# Altium PCB BD3_yd_V1.0.PcbDoc
Units mm, origin at the board's own origin, x right, y up, seen from the top; angles counter-clockwise.
Board outline 136.1 x 133.6 mm, 4 copper layers (Top Layer, Signal Layer 1, Signal Layer 2, Bottom Layer), stack 0.778 mm thick; 64 components, 67 nets, 295 pads, 103 vias.
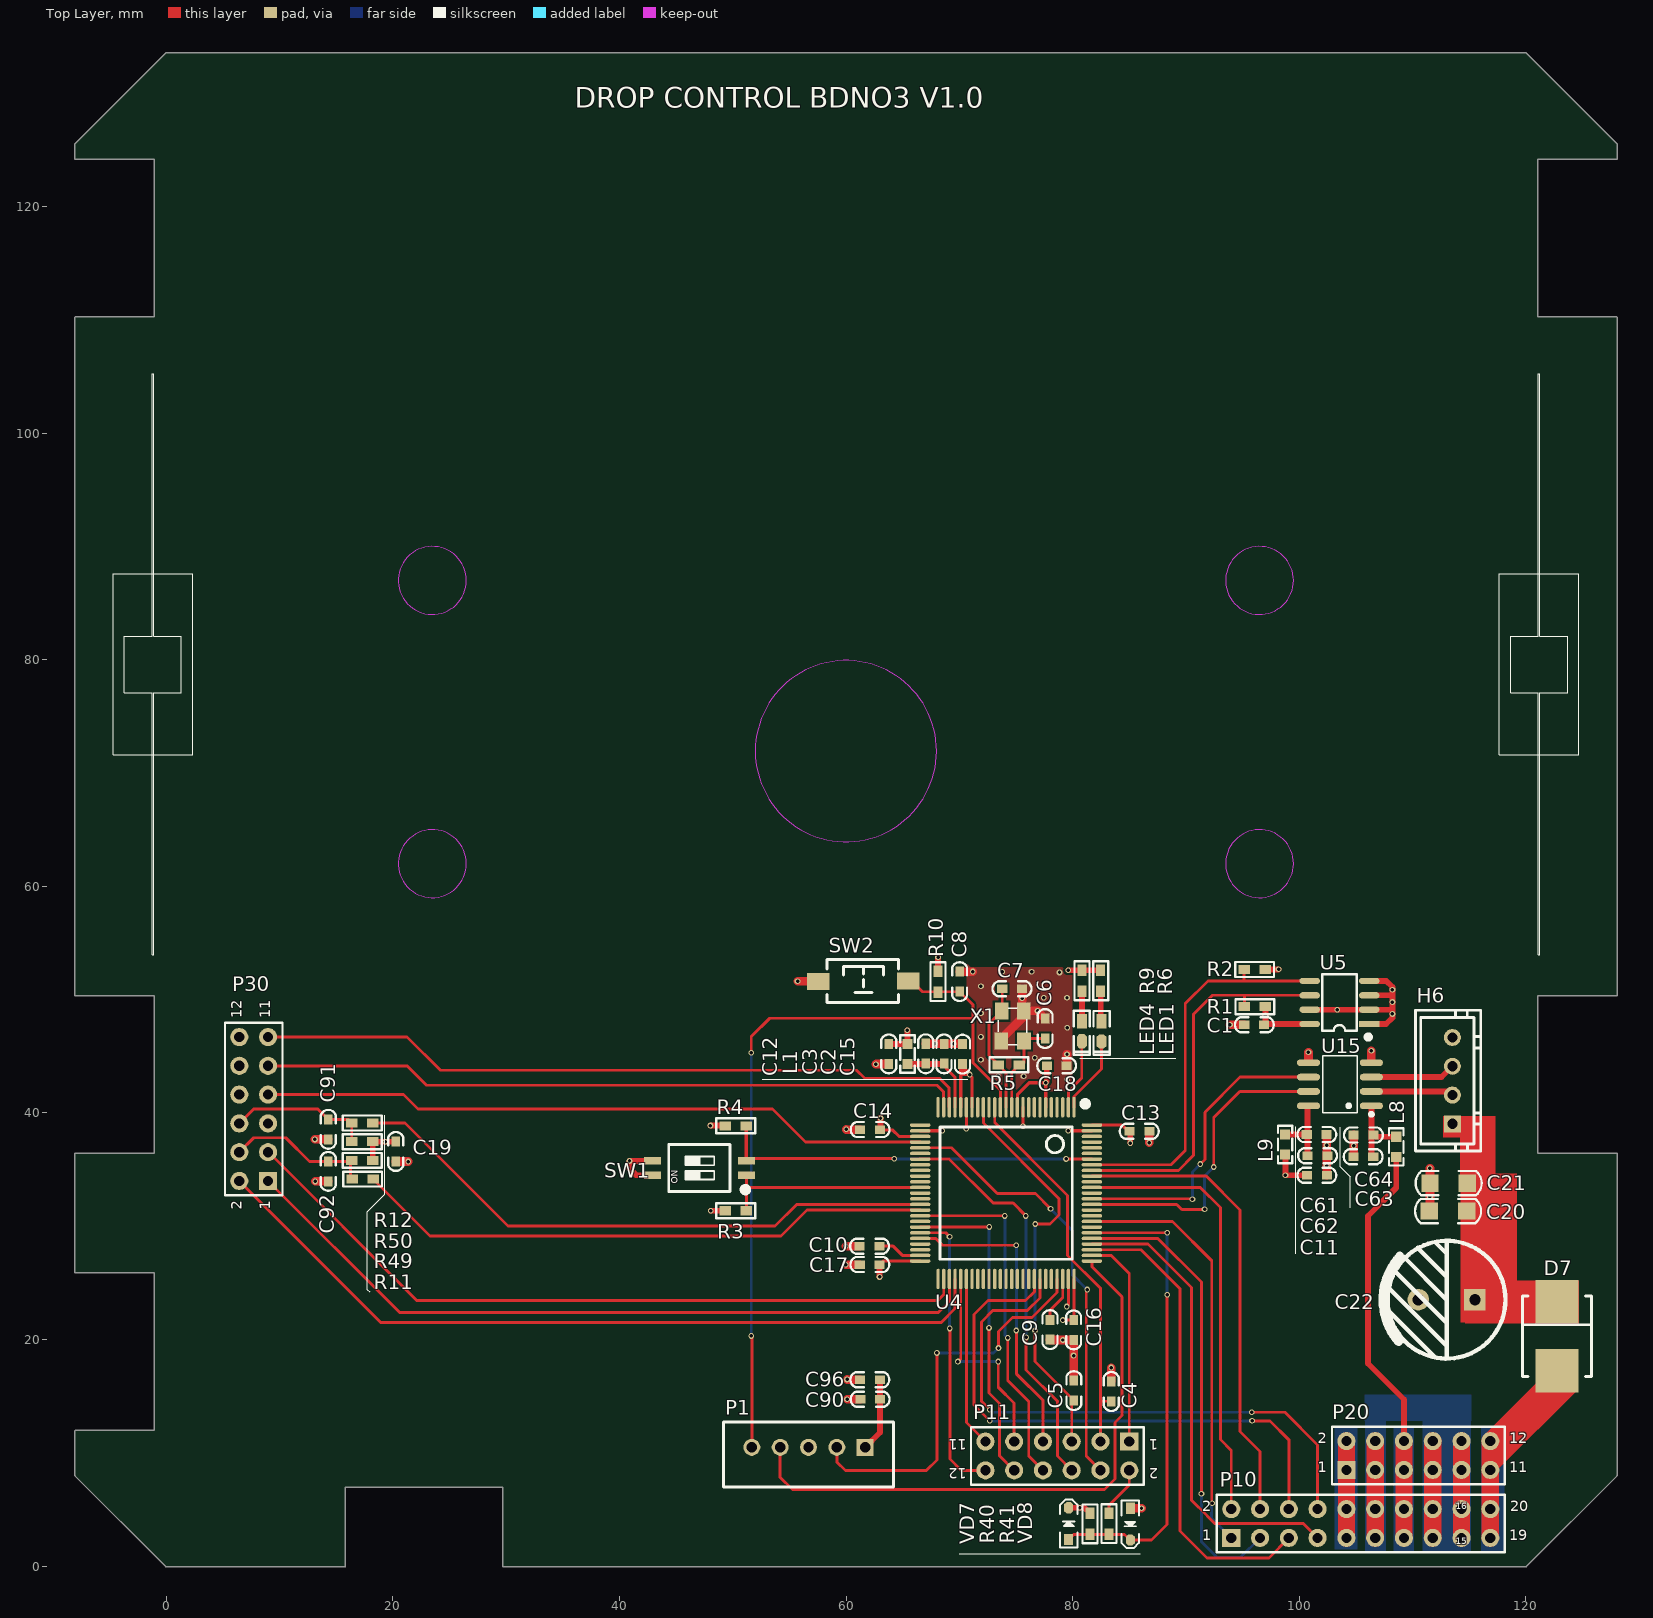
[diagram p0: Top Layer view]
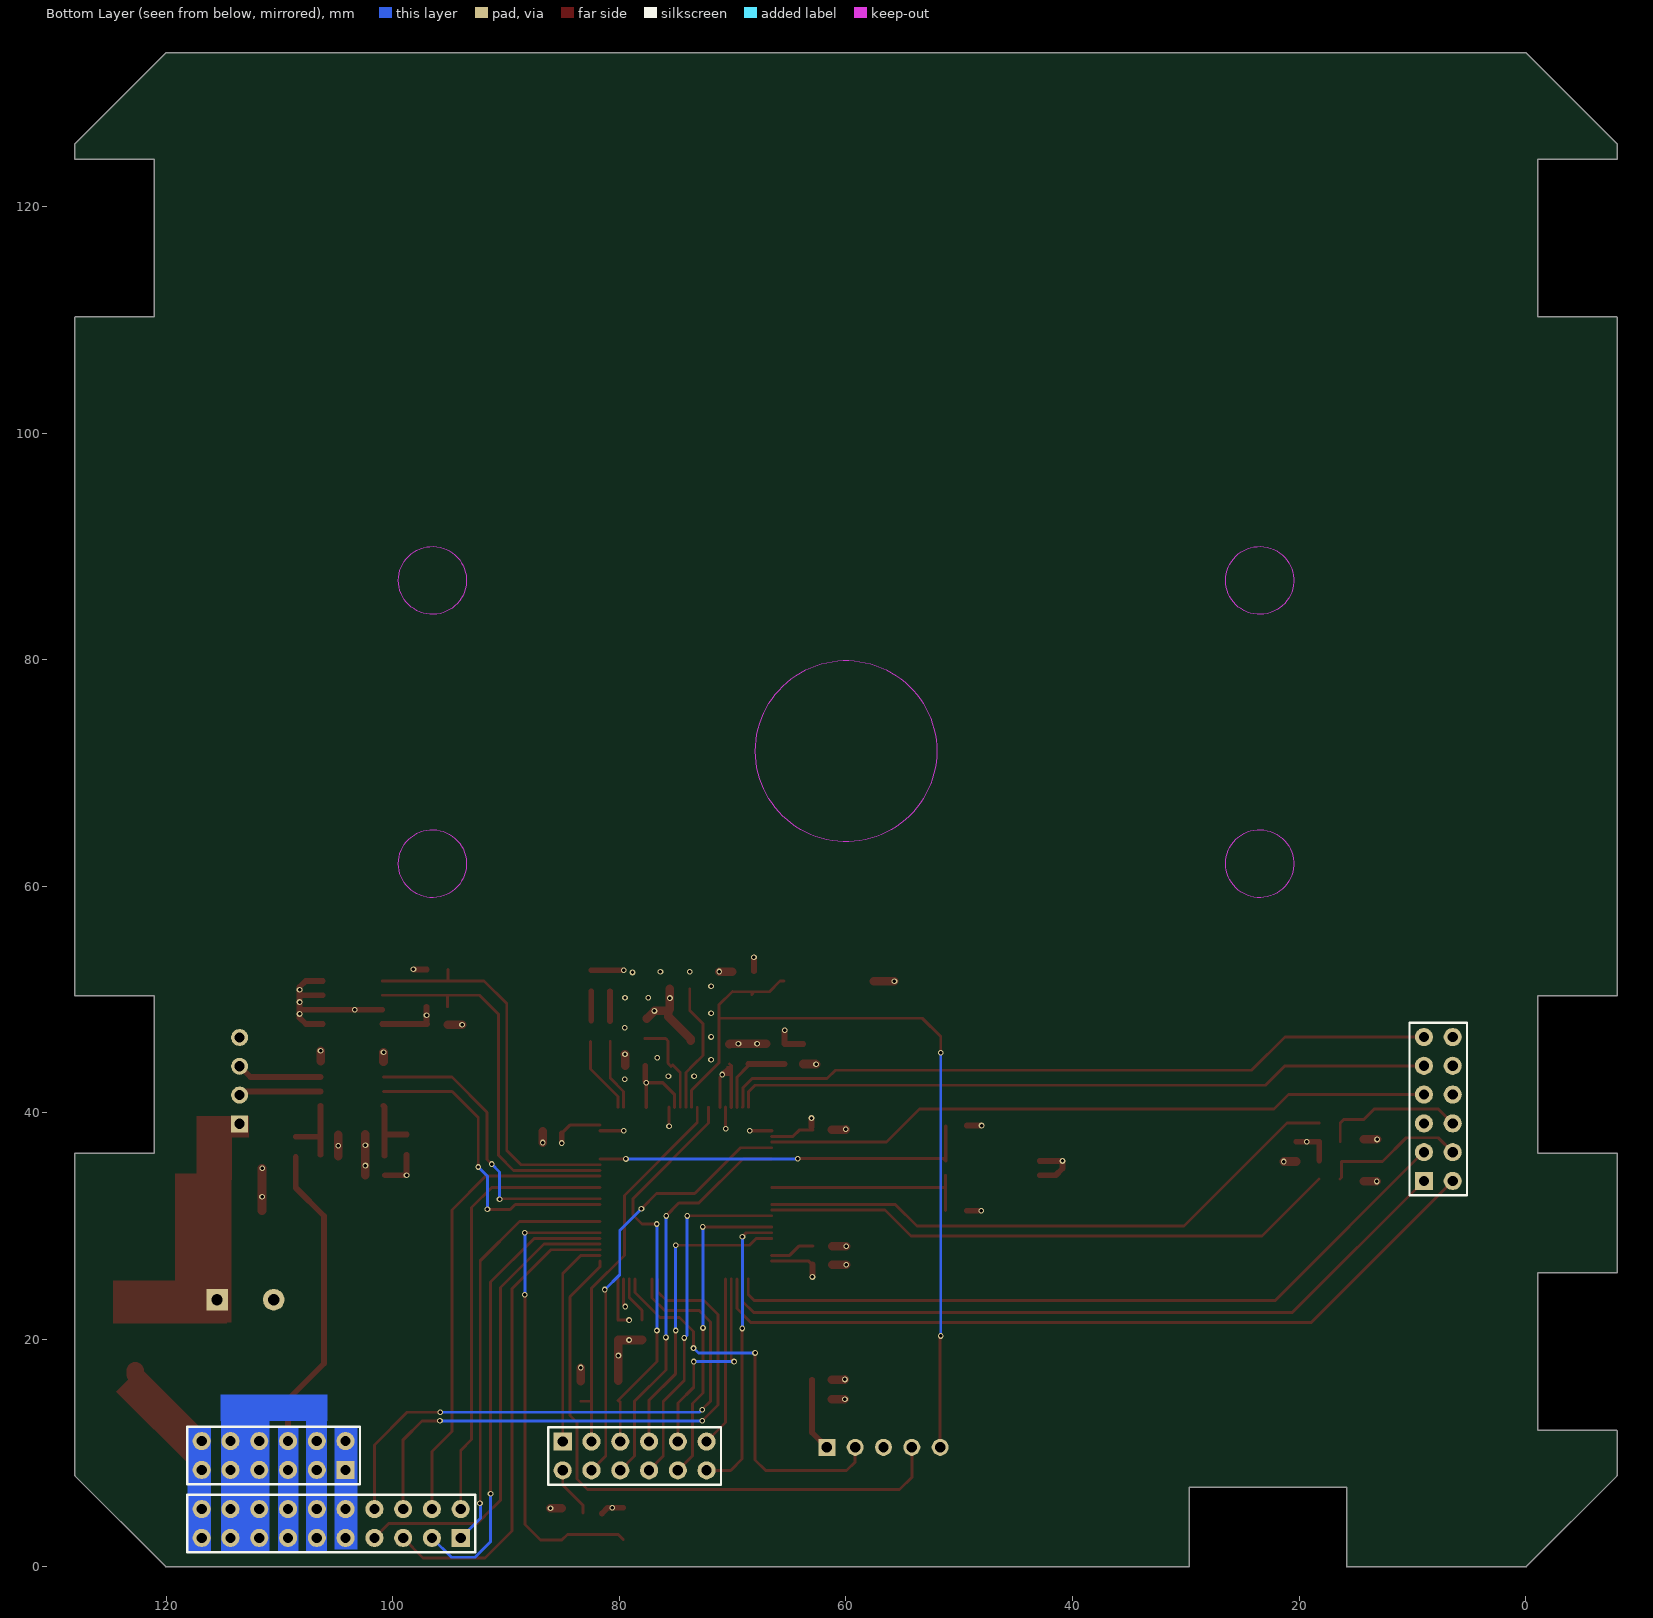
[diagram p1: Bottom Layer view, seen from below]
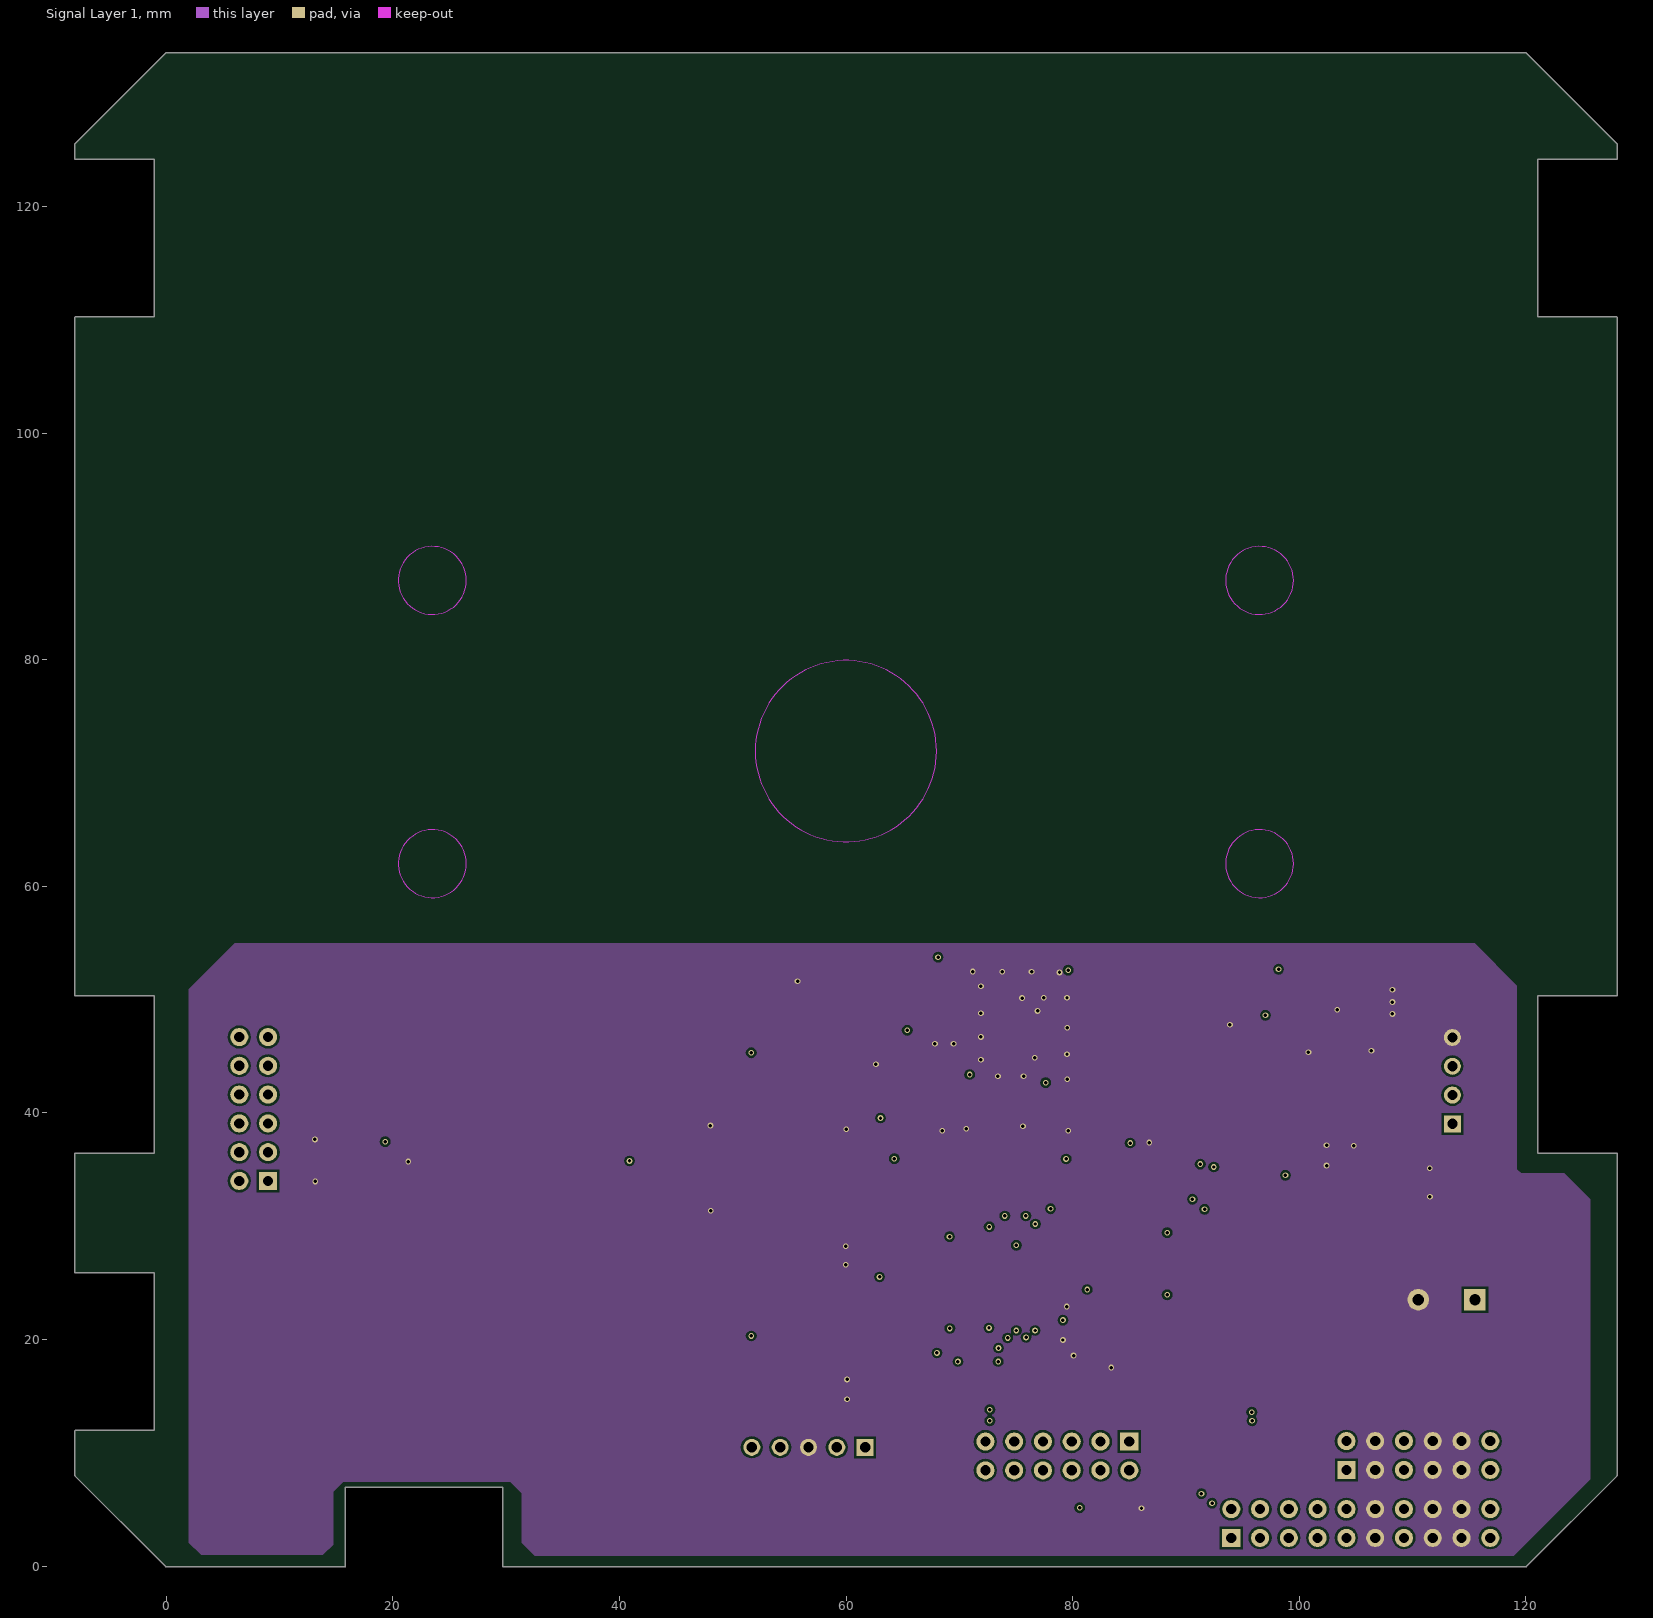
[diagram p2: Signal Layer 1]
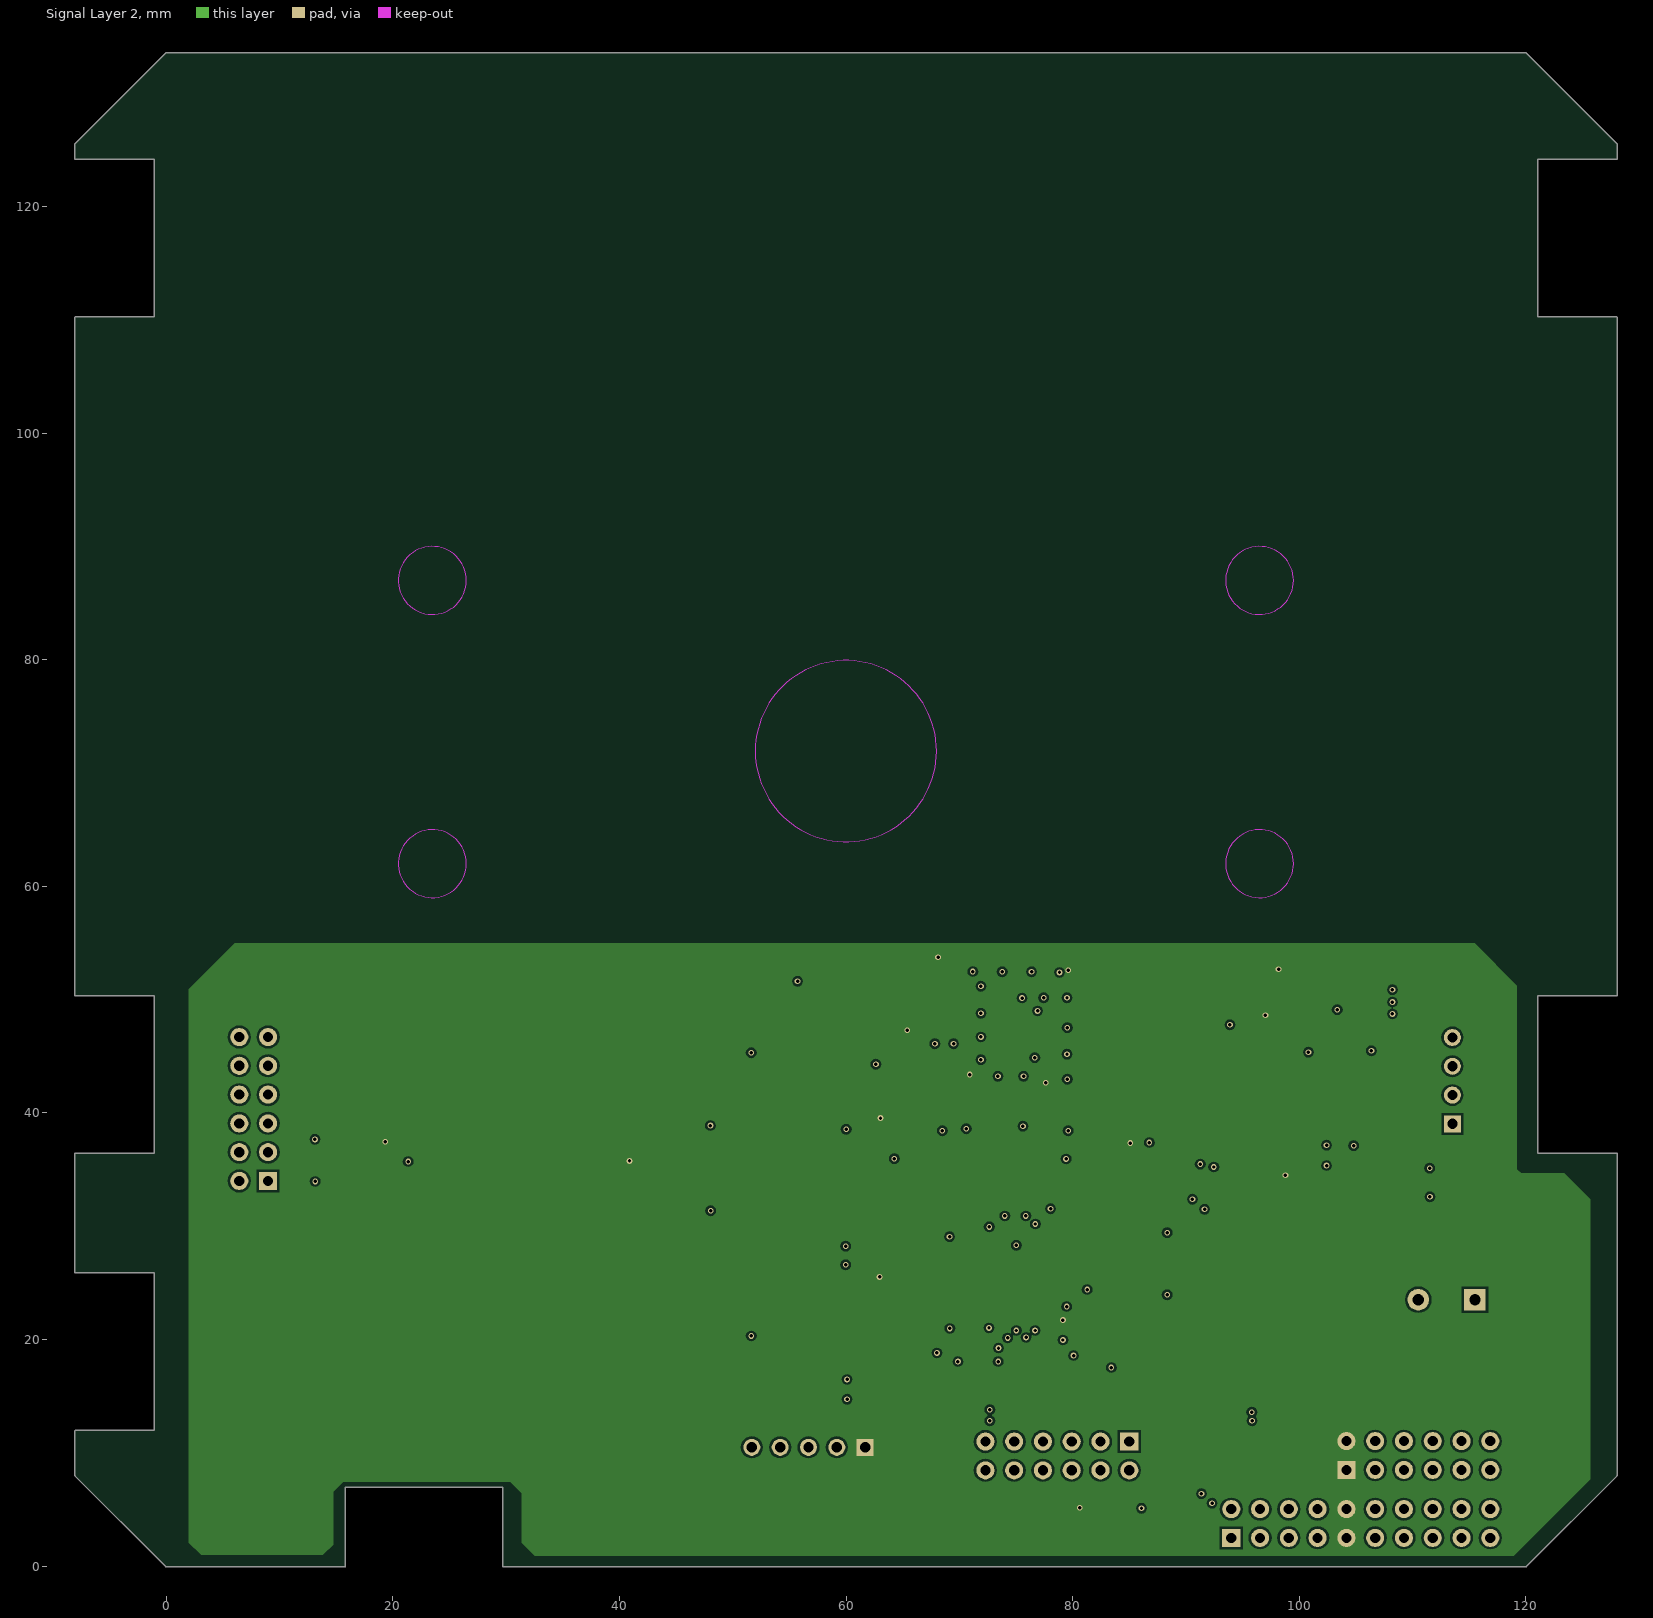
[diagram p3: Signal Layer 2]

## Layer stack, top to bottom
Top Layer: signal copper 0.0356
Dielectric: core 0.254, FR-4, Dk 4.2
Signal Layer 1: signal copper 0.036
Dielectric: prepreg 0.127, Dk 4.2
Signal Layer 2: signal copper 0.036
Dielectric: core 0.254, Dk 4.2
Bottom Layer: signal copper 0.0356

## Board outline
-8.05,8 -8.05,11.933 cw(c-8,11.933) -8,11.984 -1.05,11.984 -1.05,25.883 -8,25.883 cw(c-8,25.933) -8.05,25.933 -8.05,36.4 cw(c-8,36.4) -8,36.45 -1.05,36.45 -1.05,50.35 -8,50.35 cw(c-8,50.4) -8.05,50.4 -8.05,110.2 cw(c-8,110.2) -8,110.25 -1.05,110.25 -1.05,124.15 -8,124.15 cw(c-8,124.2) -8.05,124.2 -8.05,125.5 cw(c-8,125.5) -8.035,125.536 -8.036,125.536 -0.036,133.536 -0.036,133.535 cw(c0,133.5) 0,133.55 120,133.55 cw(c120,133.5) 120.036,133.535 128.035,125.536 cw(c128,125.5) 128.05,125.5 128.05,124.2 cw(c128,124.2) 128,124.15 121.05,124.15 121.05,110.25 128,110.25 cw(c128,110.2) 128.05,110.2 128.05,50.4 cw(c128,50.4) 128,50.35 121.05,50.35 121.05,36.45 128,36.45 cw(c128,36.4) 128.05,36.4 128.05,8 cw(c128,8) 128.035,7.964 128.036,7.964 120.036,-0.036 120.036,-0.035 cw(c120,0) 119.999,-0.05 29.773,-0.05 cw(c29.773,0) 29.723,0 29.723,6.95 15.824,6.95 15.824,0 cw(c15.773,0) 15.773,-0.05 0.001,-0.05 cw(c0,0) -0.036,-0.036 -8.035,7.964 cw(c-8,8)

## Design rules (kind name [scope] priority, off if disabled: settings)
Clearance Clearance_2 [InComponent('U4')] p1: gap=0.178
Clearance Clearance_4 [InComponent('U11')] p2: gap=0.178
Clearance Clearance_1 [InComponent('USB1')] p3: gap=0.152
Clearance Clearance_3 [InNetClass('HV Class')] p4: gap=0.7
Clearance [All] p5: gap=0.203
HoleSize [All] p1: absolutevalues=TRUE maxlimit=2539.975 minlimit=0.025 maxpercent=80.000 minpercent=20.000
MinimumSolderMaskSliver [All] p1: minsoldermaskwidth=0
PlaneConnect [InPadClass('All Pads')] p1: planeconnectstyle=Direct reliefexpansion=0.508 reliefentries=4 reliefconductorwidth=0.254 reliefairgap=0.254
PolygonConnect PolygonConnect_2 [IsVia] p1: connectstyle=Direct reliefconductorwidth=0.254 reliefentries=4 polygonreliefangle="90 Angle" airgapwidth=0.254
PolygonConnect PolygonConnect_1 [All vs InNet('GND')] p2: connectstyle=Direct reliefconductorwidth=0.254 reliefentries=4 polygonreliefangle="90 Angle" airgapwidth=0.254
PolygonConnect [All] p3: connectstyle=Direct reliefconductorwidth=0.254 reliefentries=4 polygonreliefangle="90 Angle" airgapwidth=0.254
RoutingVias RoutingVias_1 [All] p1: holewidth=0.305 width=0.508 viastyle="Through Hole" minholewidth=0.305 minwidth=0.508 maxholewidth=0.305 maxwidth=0.508
RoutingVias [All] p2: holewidth=0.305 width=2.54 viastyle="Through Hole" minholewidth=0.508 minwidth=2.54 maxholewidth=1.27 maxwidth=2.54
SilkToSilkClearance [All] p1: silktosilkclearance=0
SilkToSolderMaskClearance [IsPad] p1: minsilkscreentomaskgap=0 clearancetoexposedcopper=TRUE
SolderMaskExpansion [All] p1: expansion=0.102
Width [All] p1: maxlimit=5.08 minlimit=0.152 preferedwidth=0.254 minimp=50.000000 maximp=50.000000 favimp=50.000000
23 further rules are at their usual default settings.

## Classes and differential pairs
component class STM32F407: C1 C2 C3 C4 C5 C6 C7 C8 C9 C10 C11 C12 C13 C14 C15 C16 C17 C18 C19 C90 C91 C92 C96 L1 LED1 LED4 P1 P30 R1 R2 R3 R4 R5 R6 R9 R10 R11 R12 R49 R50 SW1 SW2 U4 U5 X1
component class Connect: C20 C21 C22 C61 C62 C63 C64 D7 H6 L8 L9 P10 P11 P20 R40 R41 U15 VD7 VD8

## Components (designator, comment, footprint, x,y, rotation, side; value= is the part's Value field where it differs from the comment)
C1 "0.1uF" "C 0603" 96.037,47.777 r0 top
C2 "0.1uF" "C 0603" 68.656,45.212 r270 top
C3 "1uF" "C 0603" 67.037,45.22 r270 top
C4 "0.1uF" "C 0603" 83.414,15.418 r270 top
C5 "0.1uF" "C 0603" 80.112,15.494 r270 top
C6 "20pF" "C 0603" 77.572,47.447 r270 top
C7 "20pF" "C 0603" 74.651,50.952 r180 top
C8 "1uF" "C 0603" 70.028,51.587 r270 top
C9 "0.1uF" "C 0603" 78.003,20.879 r90 top
C10 "0.1uF" "C 0603" 62.078,28.245 r0 top
C11 "0.1uF" "C 0603" 101.549,34.493 r180 top
C12 "0.1uF" "C 0603" 63.779,45.212 r90 top
C13 "0.1uF" "C 0603" 85.877,38.379 r180 top
C14 "0.1uF" "C 0603" 62.128,38.532 r0 top
C15 "0.1uF" "C 0603" 70.282,45.187 r270 top
C16 "0.1uF" "C 0603" 80.086,20.853 r90 top
C17 "0.1uF" "C 0603" 62.103,26.619 r0 top
C18 "0.1uF" "C 0603" 78.588,44.171 r180 top
C19 "0.1uF" "C 0603" 20.269,36.601 r90 top
C20 "0.1uF/50V" "C 1206" 113.132,31.344 r0 top
C21 "10uF/50V" "C 1206" 113.184,33.806 r0 top
C22 "220UF/50V" "CAP 5.0*10*12.5" 113.005,23.52 r180 top
C61 "0.1uF" "C 0603" 101.549,38.1 r0 top
C62 "1uF" "C 0603" 101.613,36.232 r0 top
C63 "1uF" "C 0603" 105.664,38.049 r180 top
C64 "0.1uF" "C 0603" 105.639,36.144 r180 top
C90 "1uF" "C 0603" 62.128,14.732 r180 top
C91 "0.1uF" "C 0603" 14.313,38.557 r90 top
C92 "0.1uF" "C 0603" 14.313,34.849 r90 top
C96 "0.1uF" "C 0603" 62.103,16.459 r180 top
D7 "MBRS330T3" MBRS340 122.733,17.247 r90 top
H6 "#NAME?" CONN-TH_4P-P2.50_ZX-XH2.54-4PZZ-Y 113.513,42.85 r270 top
L1 "120欧姆磁珠" "L 0603" 65.43,45.212 r270 top
L8 "120欧姆磁珠" "L 0603" 108.56,37.008 r90 top
L9 "120欧姆磁珠" "L 0603" 98.755,37.211 r270 top
LED1 "红色" "LED 0603R" 82.55,47.193 r270 top
LED4 "绿色" "LED 0603G" 80.803,47.206 r270 top
P1 "BX-XH2.54-5PZZ-Y" CONN-TH_BX-XH2.54-5PZZ-Y 56.691,10.491 r180 top
P10 "Header 10X2" HDR-10X2 94,2.5 r0 top locked
P11 "Header 6X2" HDR-6X2 85,11 r180 top locked
P20 "Header 6X2" HDR-6X2 104.16,8.5 r0 top locked
P30 "Header 6X2" HDR-6X2 9,34 r90 top locked
R1 "4.7K" "R 0603" 96.088,49.378 r180 top
R2 "4.7K" "R 0603" 96.063,52.654 r180 top
R3 "100K" "R 0603" 50.267,31.369 r180 top
R4 "100K" "R 0603" 50.267,38.862 r180 top
R5 "1M" "R 0603" 74.371,44.247 r180 top
R6 "1K" "R 0603" 82.474,51.664 r270 top
R9 "1K" "R 0603" 80.823,51.664 r270 top
R10 "10K" "R 0603" 68.123,51.587 r270 top
R11 "10R" "R 0603" 17.336,34.163 r0 top
R12 "10R" "R 0603" 17.31,39.116 r0 top
R40 "10K" "R 0603" 81.534,3.734 r270 top
R41 "0R" "R 0603" 83.21,3.759 r90 top
R49 "10K" "R 0603" 17.31,35.814 r180 top
R50 "10K" "R 0603" 17.31,37.465 r0 top
SW1 "CSW-2P" "CSW1.27 SMD-2P" 47.053,35.136 r90 top
SW2 "3x6x5" "TSW SMD-3*6*2.5" 61.544,51.638 r0 top
U4 "STM32F407VET6" "LQFP100 14x14_N" 74.124,32.926 r180 top
U5 "24C64" SOP8_N 103.548,49.749 r180 top
U15 "ADUM1201BRZ" SOIC-8_L4.9-W3.9-P1.27-LS6.0-BL 103.592,42.532 r90 top
VD7 "1N4148" SOD-323 79.654,3.759 r90 top
VD8 "1N4148" SOD-323 85.089,3.706 r270 top
X1 "8M" XTAL-3225 74.708,47.684 r0 top

## Footprints (in the part's own frame and the unit in brackets; to place one, negate y for a bottom-side part, rotate by r counter-clockwise, add the part's x,y. Pads: shape width x height; smd on the part's side, far side on the other; paste and mask are expansions set on the pad)
"C 0603" [mil]
  rect 35x30 smd: 1(-35,0) 2(34,0)
  silkscreen extent -67,-26 67,26, body extent -31,-16 31,16, height 32
"C 1206" [mil]
  rect 60x60 smd: 1(-65,0) 2(65,0)
  silkscreen extent -115,-42 115,42, body extent -63,-32 63,32, height 48
"CAP 5.0*10*12.5" [mm]
  rect 1.9x1.9 hole 1: 1(-2.5,0)
  round 1.9 hole 1: 2(2.5,0)
  silkscreen extent -5.2,-5.21 5.64,5.2, body extent -5,-5.01 5.01,4.99, height 12.55
CONN-TH_4P-P2.50_ZX-XH2.54-4PZZ-Y [mm]
  rect 1.5x1.5 hole 0.9: 1(3.81,0)
  round 1.5 hole 0.9: 2(1.27,0) 3(-1.27,0) 4(-3.81,0)
  silkscreen extent -6.21,-3.25 6.21,2.5
CONN-TH_BX-XH2.54-5PZZ-Y [mm]
  rect 1.5x1.5 hole 0.9 copper offset 0,0 paste+0 mask+0.05: 1(-5,0)
  round 1.5 hole 0.9 paste+0 mask+0.05: 2(-2.5,0) 4(2.5,0)
  round 1.5 hole 0.9 copper offset 0,0 paste+0 mask+0.05: 3(0,0) 5(5,0)
  silkscreen extent -7.5,-2.25 7.5,3.5
"CSW1.27 SMD-2P" [mm]
  rect 0.65x1.5 smd: 1(-0.635,-4.15) 2(0.635,-4.15) 3(0.635,4.15) 4(-0.635,4.15)
  silkscreen extent -2.15,-4.31 2.07,2.7, body extent -2.07,-4.35 2.07,4.35, height 2.35
HDR-6X2 [mm]
  rect 1.6x1.6 hole 0.9: 1(0,0)
  round 1.6 hole 0.9: 2(0,2.54) 3(2.54,0) 4(2.54,2.54) 5(5.08,0) 6(5.08,2.54) 7(7.62,0) 8(7.62,2.54) 9(10.16,0) 10(10.16,2.54) 11(12.7,0) 12(12.7,2.54)
  silkscreen extent -1.27,-1.27 13.97,3.81, body extent -1.27,-1.27 13.97,3.81, height 8.5
HDR-10X2 [mm]
  rect 1.6x1.6 hole 0.9: 1(0,0)
  round 1.6 hole 0.9: 2(0,2.54) 3(2.54,0) 4(2.54,2.54) 5(5.08,0) 6(5.08,2.54) 7(7.62,0) 8(7.62,2.54) 9(10.16,0) 10(10.16,2.54) 11(12.7,0) 12(12.7,2.54) 13(15.24,0) 14(15.24,2.54) 15(17.78,0) 16(17.78,2.54) 17(20.32,0) 18(20.32,2.54) 19(22.86,0) 20(22.86,2.54)
  silkscreen extent -1.27,-1.27 24.13,3.81, body extent -1.27,-1.27 24.13,3.81, height 8.5
"L 0603" [mil] "С?"
  rect 35x35 smd: 1(-35,0) 2(35,0)
  silkscreen extent -65,-25 65,25, body extent -31,-16 31,16, height 31
"LED 0603G" [mil]
  rect 50x35 smd: 1(-35,0.26)
  oct 50x35 smd: 2(35,0.26)
  silkscreen extent -71,-28 81,28, body extent -31,-16 32,16, height 24
"LED 0603R" [mil]
  rect 50x35 smd: 1(-35,0.26)
  oct 50x35 smd: 2(35,0.26)
  silkscreen extent -71,-28 81,28, body extent -24,-16 24,16, height 24
"LQFP100 14x14_N" [mm] "100脚?"
  oval 0.3x1.8 smd: 1(-6,-7.575) 2(-5.5,-7.575) 3(-5,-7.575) 4(-4.5,-7.575) 5(-4,-7.575) 6(-3.5,-7.575) 7(-3,-7.575) 8(-2.5,-7.575) 9(-2,-7.575) 10(-1.5,-7.575) 11(-1,-7.575) 12(-0.5,-7.575) 13(0,-7.575) 14(0.5,-7.575) 15(1,-7.575) 16(1.5,-7.575) 17(2,-7.575) 18(2.5,-7.575) 19(3,-7.575) 20(3.5,-7.575) 21(4,-7.575) 22(4.5,-7.575) 23(5,-7.575) 24(5.5,-7.575) 25(6,-7.575) 51(6,7.575) 52(5.5,7.575) 53(5,7.575) 54(4.5,7.575) 55(4,7.575) 56(3.5,7.575) 57(3,7.575) 58(2.5,7.575) 59(2,7.575) 60(1.5,7.575) 61(1,7.575) 62(0.5,7.575) 63(0,7.575) 64(-0.5,7.575) 65(-1,7.575) 66(-1.5,7.575) 67(-2,7.575) 68(-2.5,7.575) 69(-3,7.575) 70(-3.5,7.575) 71(-4,7.575) 72(-4.5,7.575) 73(-5,7.575) 74(-5.5,7.575) 75(-6,7.575)
  oval 1.8x0.3 smd: 26(7.576,-6) 27(7.576,-5.5) 28(7.576,-5) 29(7.576,-4.5) 30(7.576,-4) 31(7.576,-3.5) 32(7.576,-3) 33(7.576,-2.5) 34(7.576,-2) 35(7.576,-1.5) 36(7.576,-1) 37(7.576,-0.5) 38(7.576,0) 39(7.576,0.5) 40(7.576,1) 41(7.576,1.5) 42(7.576,2) 43(7.576,2.5) 44(7.576,3) 45(7.576,3.5) 46(7.576,4) 47(7.576,4.5) 48(7.576,5) 49(7.576,5.5) 50(7.576,6) 76(-7.575,6) 77(-7.575,5.5) 78(-7.575,5) 79(-7.575,4.5) 80(-7.575,4) 81(-7.575,3.5) 82(-7.575,3) 83(-7.575,2.5) 84(-7.575,2) 85(-7.575,1.5) 86(-7.575,1) 87(-7.575,0.5) 88(-7.575,0) 89(-7.575,-0.5) 90(-7.575,-1) 91(-7.575,-1.5) 92(-7.575,-2) 93(-7.575,-2.5) 94(-7.575,-3) 95(-7.575,-3.5) 96(-7.575,-4) 97(-7.575,-4.5) 98(-7.575,-5) 99(-7.575,-5.5) 100(-7.575,-6)
  silkscreen extent -7.23,-8.12 5.84,5.84, body extent -8,-8 8,8, height 1.45
MBRS340 [mil]
  rect 150x150 smd: 1(0,0) 2(240,0)
  silkscreen extent -20,-120 260,120
"R 0603" [mil]
  rect 40x31.5 smd: 1(-36.5,0) 2(36.5,0)
  silkscreen extent -68,-26 68,26, body extent -31,-16 32,16, height 16
SOD-323 [mm]
  rect 1x0.8 smd: 1(-1.4,0)
  oct 1x0.8 smd: 2(1.4,0)
  silkscreen extent -2.11,-0.76 2.11,0.76, body extent -1.34,-0.63 1.31,0.67, height 1
SOIC-8_L4.9-W3.9-P1.27-LS6.0-BL [mm]
  oval 0.588x2.045 smd: 1(-1.905,-2.772) 2(-0.635,-2.772) 3(0.635,-2.772) 4(1.905,-2.772) 5(1.905,2.772) 6(0.635,2.772) 7(-0.635,2.772) 8(-1.905,2.772)
  silkscreen extent -2.8,-2.92 2.53,1.52
SOP8_N [mm] "5*6*1"
  rect 1.8x0.55 smd: 1(-2.625,1.905)
  oval 1.8x0.55 smd: 2(-2.625,0.635) 3(-2.625,-0.635) 4(-2.625,-1.905) 5(2.625,-1.905) 6(2.625,-0.635) 7(2.625,0.635) 8(2.625,1.905)
  silkscreen extent -2.69,-2.5 1.52,3.2, body extent -3,-2.5 3,2.5, height 1.9
"TSW SMD-3*6*2.5" [mm]
  rect 2x1.5 smd: 1(-3.996,-0.02) 2(3.937,0)
  silkscreen extent -3.21,-1.9 3.09,1.9, body extent -4,-1.88 4,1.62, height 2.59
XTAL-3225 [mm]
  rect 1.2x1.5 smd: 1(-0.978,1.295) 2(-1.003,-1.321) 3(1.003,-1.321) 4(0.978,1.321)
  silkscreen extent -1.28,-1.65 1.22,1.55, body extent -1.27,-1.65 1.23,1.55, height 0.8

## Part data
D7: library part "DIODE SCHOTTKY", "Schottky Diode"
H6: library part HB-PH3-25414PB2GOP
L1 L8 L9: library part FERRITBEAD
LED1 LED4: library part LED-SMD, "贴?"
P10: "Header, 10-Pin, Dual row"
P11 P20 P30: "Header, 6-Pin, Dual row"
U5: library part 24LC02

## Via types
v1: diameter 0.508, hole 0.305, Top Layer to Bottom Layer, 103 vias

## Nets (pads, with @x,y where several pads share a name; then routed paths per layer and width w, separated by ;. In a path a pad name is that pad's centre, name@x,y a point inside that pad or via, vN(x,y) a via of type N, cw(c..) or ccw(c..) an arc to the next point about the centre after c; other vN are vias at no path point)
A2: C4.2 P11.3 U4.15 | length 34.3
  Top Layer w0.254: U4.15 73.123,39.145 79.553,32.715 79.553,27.432 82.46,24.525 82.46,14.554 ; P11.3 82.46,14.554 ; C4.2 82.46,14.554
ADC2: C5.2 P11.5 U4.17 | length 35.4
  Top Layer w0.254: U4.17 72.123,39.103 78.791,32.436 78.791,30.988 78.003,30.201 v1(76.708,30.201) ; v1(76.683,20.803) 76.683,18.059 C5.2 ; P11.5 79.92,14.464 C5.2@80.086,14.63
  Bottom Layer w0.254: v1(76.683,20.803) 76.683,30.175 v1(76.708,30.201)
ADC3: U4.18
B2: U4.16
BOOT0: R4.1 SW1.2 U4.94 | length 33.7
  Top Layer w0.279: SW1.2@51.194,35.78 R4.1 ; SW1.2 51.398,35.966 v1(64.262,35.966) ; v1(79.426,35.941) 79.44,35.926 U4.94
  Bottom Layer w0.279: v1(64.262,35.966) 64.262,35.941 v1(79.426,35.941)
BOOT1: R3.1 SW1.1 U4.37 | length 19.5
  Top Layer w0.254: R3.1@51.203,31.378 SW1.1 51.203,33.481 51.257,33.426 U4.37
DRDY: U4.3
GND: C1.1 C2.1 C3.1 C4.1 C5.1 C6.1 C7.1 C8.1 C9.1 C10.1 C11.1 C12.1 C13.1 C14.1 C15.1 C16.1 C17.1 C18.1 C19.1 C20.1 C21.1 C22.2 C61.2 C62.2 C63.2 C64.2 C90.2 C91.1 C92.1 C96.2 H6.4 P1.3 P10.11 P10.12 P10.15 P10.16 P10.17 P10.18 P20.3 P20.4 P20.7 P20.8 P20.9 P20.10 R3.2 R4.2 SW2.1 U4.10 U4.20 U4.27 U4.74 U4.99 U5.1 U5.2 U5.3 U5.4 U5.7 U15.4 U15.5 VD8.1 X1.2 X1.4 | length 101.6
  Top Layer w0.279: U4.27 68.5,38.426 v1(68.504,38.43) ; v1(70.612,38.608) 70.623,38.619 U4.20 ; v1(75.616,38.837) 75.616,38.786 75.623,38.778 U4.10 ; v1(79.477,22.911) 79.623,23.058 U4.74 ; v1@79.604,38.426 U4.99
  Top Layer w0.508: v1(48.031,38.887) 49.314,38.887 R4.2 ; v1(48.057,31.369) R3.2 ; U5.7 v1(103.353,49.114) U5.2 108.153,49.114 ; U5.1 107.661,47.844 108.219,48.402 v1(108.219,48.743) v1(108.219,49.784) v1(108.219,50.876) 108.219,51.115 107.681,51.654 U5.4 ; U5.3 108.153,50.384
  Top Layer w0.762: v1(13.132,37.668) C91.1 ; v1(13.157,33.96) C92.1 ; C19.1 v1(21.361,35.712) ; v1(55.728,51.613) 55.733,51.618 SW2.1 ; v1(59.969,26.594) 59.995,26.619 C17.1 ; v1(59.969,28.245) C10.1 ; v1(60.02,38.557) 60.046,38.532 C14.1 ; v1(60.096,14.732) C90.2 ; v1(60.096,16.485) 60.122,16.459 C96.2 ; v1(62.636,44.298) 62.662,44.323 C12.1 ; C3.1 v1(67.843,46.109) v1(69.494,46.109) 70.248,46.109 C15.1 ; C8.1 v1(71.196,52.476) ; X1.2 73.704,46.533 75.686,48.514 X1.4 ; C7.1 v1(75.54,50.14) 75.54,49.151 X1.4 ; C6.1 v1(76.903,49.005) X1.4 ; C9.1 78.029,19.964 v1(79.146,19.964) C16.1 v1(80.086,18.593) 80.086,16.408 C5.1 ; C18.1 79.477,45.161 v1(79.502,45.187) ; C4.1 v1(83.414,17.526) ; VD8.1 v1(86.08,5.106) ; v1(86.766,37.389) C13.1 ; v1(93.878,47.777) C1.1 ; v1(100.813,45.364) 100.819,45.358 U15.5@100.819,44.526 ; C61.2 v1(102.413,37.16) v1(102.413,35.357) 102.413,34.519 C11.1 ; C64.2@104.8,36.17 v1(104.8,37.109) C63.2 ; U15.4@106.364,44.552 v1(106.364,45.481) ; v1(111.506,35.128) 111.533,35.101 C21.1 v1(111.533,32.602) C20.1@111.533,31.397
  Top Layer w1.524: P10.11 P10.12 P20.3 P20.4 ; P10.15 P10.16 P20.7 P20.8 ; P10.17 P10.18 P20.9 P20.10
  other v1: 79.604,38.43 79.527,42.977 73.406,43.231 75.667,43.231 71.907,44.704 76.657,44.882 71.907,46.711 79.527,47.523 71.907,48.793 77.445,50.165 79.502,50.165 71.907,51.181 78.842,52.4 73.787,52.451 76.378,52.451
IIC_SCL: R1.2 U4.92 U5.6 | length 33.9
  Top Layer w0.254: U4.92 89.333,34.926 90.678,36.271 90.678,48.717 92.344,50.384 U5.6 ; R1.2 95.161,50.32
IIC_SCL_0: U4.70
IIC_SDA: R2.2 U4.93 U5.5 | length 34.5
  Top Layer w0.254: U4.93 88.69,35.426 89.941,36.678 89.941,49.657 91.938,51.654 U5.5 ; 95.136,51.666 R2.2
IIC_SDA_0: U4.71
LEDG: LED4.2 U4.2 | length 6.3
  Top Layer w0.254: U4.2 79.623,41.904 80.809,43.09 LED4.2
LEDR: LED1.2 U4.1 | length 6.8
  Top Layer w0.254: U4.1 80.123,41.439 82.557,43.872 LED1.2
MCU＿NRST: C8.2 P1.5 R10.2 SW2.2 U4.14 | length 73.4
  Top Layer w0.254: v1(51.638,20.32) 51.691,20.267 P1.5 ; v1(51.638,45.314) 51.638,46.736 53.264,48.362 71.196,48.362 ; SW2.2 65.811,51.638 66.751,50.698 70.002,50.698 C8.2 71.196,49.555 71.196,48.362 ; R10.2 R10.2@68.313,50.47 ; U4.14 73.623,41.997 71.196,44.425 71.196,48.362
  Bottom Layer w0.254: v1(51.638,20.32) v1(51.638,45.314)
NetC6_2: C6.2 R5.1 U4.12 X1.3 | length 8.5
  Top Layer w0.254: U4.12 74.623,43.572 R5.1 ; R5.1@75.432,44.113 75.711,44.393 X1.3 75.914,46.566 C6.2@77.756,46.566
NetC7_2: C7.2 R5.2 U4.13 X1.1 | length 11.5
  Top Layer w0.254: X1.1 72.619,47.868 72.619,45.072 R5.2 74.123,43.567 U4.13 ; X1.1@73.787,49.036 C7.2
NetC9_2: C9.2 U4.73 | length 4.1
  Top Layer w0.254: C9.2 78.003,22.581 79.123,23.701 U4.73
NetC10_2: C10.2 U4.49 | length 3.9
  Top Layer w0.279: C10.2 64.16,28.245 64.979,27.426 U4.49
NetC20_2: C20.2 C21.2 C22.1 D7.2 H6.1
NetC61_1: C61.1 C62.1 L9.1 U15.8 | length 6.3
  Top Layer w0.508: L9.1 C61.1 ; C62.1 100.724,40.531 U15.8
NetC63_1: C63.1 C64.1 L8.2 U15.1 | length 6.2
  Top Layer w0.508: C64.1@106.364,36.307 C63.1@106.364,37.897 ; C63.1@106.364,38.049 U15.1 ; C63.1@106.517,37.897 L8.2
NetC91_2: C91.2 P30.6 R12.1 R50.1 | length 12.6
  Top Layer w0.254: P30.6 7.73,40.35 13.384,40.35 C91.2 16.078,39.421 R12.1 R50.1
NetC92_2: C92.2 P30.4 R11.1 R49.2 | length 12.8
  Top Layer w0.254: P30.4 7.73,37.81 10.552,37.81 12.649,35.712 C92.2 16.282,35.712 16.282,34.29 R11.1
NetD7_1: D7.1 P10.19 P10.20 P20.11 P20.12 | length 17.2
  Top Layer w1.524: P10.19 P10.20 P20.11 P20.12 122.733,16.913 D7.1
NetLED1_1: LED1.1 R6.2 | length 2.6
  Top Layer w0.508: LED1.1@82.474,48.165 R6.2
NetLED4_1: LED4.1 R9.2 | length 2.6
  Top Layer w0.508: LED4.1@80.823,48.108 R9.2
NetP10_1: P10.1 U4.83 | length 37.2
  Top Layer w0.254: U4.83 88.801,30.426 92.278,26.949 92.278,5.588 v1(92.304,5.563)
  Bottom Layer w0.254: v1@92.278,5.588 92.266,5.576 92.266,4.234 P10.1
NetP10_3: P10.3 U4.80 | length 40.6
  Top Layer w0.254: U4.80 87.507,28.926 91.364,25.07 v1(91.364,6.401)
  Bottom Layer w0.254: v1(91.364,6.401) 91.364,2.159 92.735,0.787 94.827,0.787 P10.3
NetP11_2: P11.2 R41.2 | length 4.5
  Top Layer w0.254: R41.2 83.21,5.385 85,7.174 P11.2
NetP11_7: P11.7 U4.46 | length 27
  Top Layer w0.254: U4.46 67.924,28.926 68.529,28.321 v1(75.032,28.321) ; v1(75.032,20.803) 75.032,16.993 77.38,14.644 P11.7
  Bottom Layer w0.254: v1(75.032,20.803) v1(75.032,28.321)
NetP11_8: P11.8 U4.42 | length 31.3
  Top Layer w0.254: U4.42 74.016,30.926 v1(74.016,30.912) ; v1(74.27,20.142) 74.27,16.383 76.124,14.529 76.124,9.716 P11.8
  Bottom Layer w0.254: v1(74.016,30.912) 74.016,20.396 v1(74.27,20.142)
NetP11_10: P11.10 U4.44 | length 28.5
  Top Layer w0.254: U4.44 72.619,29.926 72.639,29.947 v1(72.644,29.947) ; v1(72.619,21.031) 72.619,15.291 73.558,14.351 73.558,9.742 P11.10
  Bottom Layer w0.254: v1(72.619,21.031) 72.619,29.921 v1(72.644,29.947)
NetP11_12: P11.12 U4.45 | length 25.9
  Top Layer w0.254: U4.45 68.795,29.426 v1(69.139,29.083) ; v1(69.164,20.98) 69.164,9.474 70.178,8.46 P11.12
  Bottom Layer w0.254: v1(69.139,29.083) 69.139,21.006 v1(69.164,20.98)
NetR40_2: R40.2 R41.1 U4.81 VD7.1 VD8.2 | length 42.1
  Top Layer w0.254: VD7.1 80.102,2.807 R40.2 84.589,2.807 VD8.2 86.965,2.306 88.341,3.683 v1(88.341,23.952) ; U4.81 88.329,29.426 v1(88.341,29.439)
  Bottom Layer w0.254: v1(88.341,23.952) v1(88.341,29.439)
OLED_CS: P30.7 U4.29 | length 59.3
  Top Layer w0.254: P30.7 20.94,41.62 22.225,40.335 53.518,40.335 56.427,37.426 U4.29
OLED_DC: P30.9 U4.24 | length 61.9
  Top Layer w0.254: P30.9 21.27,44.16 22.987,42.443 68.021,42.443 68.621,41.844 U4.24@68.621,40.502
OLED_RES: P30.11 U4.23 | length 63.7
  Top Layer w0.254: P30.11 21.27,46.7 24.206,43.764 60.935,43.764 61.671,43.028 68.275,43.028 69.078,42.225 69.078,40.547 U4.23
PA15/JTDI: P11.1 U4.77 | length 18.8
  Top Layer w0.254: U4.77 83.408,27.426 85,25.834 P11.1
PF_EN: U4.5
PRO: U4.57
RXD1_PC: P10.8 U4.69 | length 51.6
  Top Layer w0.254: v1(72.695,13.818) 71.958,14.554 71.958,21.565 72.974,22.581 76.022,22.581 77.123,23.682 U4.69 ; v1(95.809,13.589) 98.73,13.589 101.62,10.699 P10.8
  Bottom Layer w0.254: v1(72.695,13.818) 72.923,13.589 v1(95.809,13.589)
RXD2_5V: H6.3 U15.3 | length 7.5
  Top Layer w0.508: U15.3 112.56,43.167 H6.3
RXD2_RS485: U4.87 U15.6 | length 27.5
  Top Layer w0.254: U4.87 90.535,32.426 v1(90.576,32.385) ; v1(91.262,35.484) 91.669,35.89 91.669,40.056 94.78,43.167 U15.6
  Bottom Layer w0.254: v1(90.576,32.385) 90.576,34.798 v1(91.262,35.484)
RXD3_RS232: P11.11 U4.56 | length 15
  Top Layer w0.254: U4.56 70.623,12.677 P11.11
RXD4_HV: P10.7 U4.79 | length 41.7
  Top Layer w0.254: U4.79 86.661,28.426 90.5,24.587 90.5,5.817 91.846,4.47 91.846,4.459 92.535,3.77 100.35,3.77 P10.7
SPI_MISO_1: U4.31
SPI_MISO_2: P30.1 U4.53 | length 67.3
  Top Layer w0.254: P30.1 20.623,22.377 68.148,22.377 69.123,23.353 U4.53
SPI_MISO_3: U4.90
SPI_MOSI_1: P11.6 U4.32 | length 35.5
  Top Layer w0.254: U4.32 69.103,35.926 72.987,32.042 74.752,32.042 75.87,30.925 v1(75.87,30.912) ; v1(75.895,20.193) 75.895,17.323 78.664,14.554 78.664,9.716 P11.6
  Bottom Layer w0.254: v1(75.87,30.912) 75.87,20.218 v1(75.895,20.193)
SPI_MOSI_2: P30.2 U4.54 | length 71.5
  Top Layer w0.254: P30.2 18.946,21.514 68.402,21.514 69.623,22.735 U4.54
SPI_MOSI_3: P10.4 U4.91 | length 41.4
  Top Layer w0.254: U4.91 91.786,34.426 94.767,31.445 94.767,11.887 96.54,10.115 P10.4
SPI_SCK_1: P11.4 U4.30 | length 38.7
  Top Layer w0.254: U4.30 69.317,36.926 73.355,32.888 76.713,32.888 v1(78.054,31.547) ; v1(81.28,24.409) 81.204,24.333 81.204,9.716 P11.4
  Bottom Layer w0.254: v1(78.054,31.547) 79.966,29.635 79.966,25.724 v1(81.28,24.409)
SPI_SCK_2: P30.3 U4.52 | length 66.6
  Top Layer w0.254: P30.3 9.028,36.54 22.123,23.444 68.097,23.444 68.623,23.97 U4.52
SPI_SCK_3: P10.2 U4.89 | length 39.1
  Top Layer w0.254: U4.89 91.262,33.426 93.04,31.648 93.04,11.176 94,10.216 P10.2
SWCLK: P1.4 U4.76 | length 53.6
  Top Layer w0.254: P1.4 54.191,7.836 55.27,6.756 82.804,6.756 83.73,7.682 83.73,12.686 84.353,13.31 84.353,23.774 81.699,26.429 U4.76
SWDIO: P1.2 U4.72 | length 35.1
  Top Layer w0.254: P1.2 59.191,9.195 59.953,8.433 67.081,8.433 68.021,9.373 v1(68.021,18.821) ; v1(73.457,19.253) 73.457,20.701 74.701,21.946 76.403,21.946 78.623,24.166 U4.72
  Bottom Layer w0.254: v1(68.021,18.821) 73.025,18.821 v1(73.457,19.253)
SWITCH_IN01: R12.2 U4.40 | length 52.9
  Top Layer w0.254: R12.2 21.082,39.116 30.175,30.023 53.746,30.023 55.65,31.926 U4.40
SWITCH_IN02: R11.2 U4.41 | length 51.3
  Top Layer w0.254: R11.2 23.292,29.134 54.254,29.134 56.547,31.426 U4.41
TXD1_PC: P10.6 U4.68 | length 50.4
  Top Layer w0.254: v1(72.695,12.827) 71.298,14.224 71.298,22.2 72.542,23.444 75.844,23.444 76.623,24.223 U4.68 ; v1(95.834,12.827) 97.409,12.827 99.08,11.156 P10.6
  Bottom Layer w0.254: v1(72.695,12.827) v1(95.834,12.827)
TXD2_5V: H6.2 U15.2 | length 7.3
  Top Layer w0.508: U15.2 113.195,41.897 H6.2
TXD2_RS485: U4.86 U15.7 | length 27.9
  Top Layer w0.254: U4.86 89.181,31.926 89.637,31.471 91.618,31.471 v1(91.643,31.496) ; v1(92.456,35.23) 92.456,39.599 94.754,41.897 U15.7
  Bottom Layer w0.254: v1(91.643,31.496) 91.643,34.417 v1(92.456,35.23)
TXD3_RS232: P11.9 U4.55 | length 18.6
  Top Layer w0.254: v1(69.875,18.059) 70.123,18.307 U4.55 ; v1(73.431,18.059) 73.431,15.799 74.84,14.39 P11.9
  Bottom Layer w0.254: v1(69.875,18.059) v1(73.431,18.059)
TXD4_HV: P10.5 U4.78 | length 41.9
  Top Layer w0.254: U4.78 86.043,27.926 89.484,24.486 89.484,3.099 91.846,0.737 97.317,0.737 P10.5
VCC_3.3V: C1.2 C11.2 C12.2 C13.2 C14.2 C15.2 C16.2 C17.2 C18.2 C19.2 C90.1 C96.1 L1.1 L9.2 P1.1 P10.9 P10.10 P20.1 P20.2 R1.1 R2.1 R6.1 R9.1 R10.1 R40.1 R49.1 R50.2 SW1.3 SW1.4 U4.6 U4.11 U4.19 U4.21 U4.28 U4.50 U4.75 U4.100 U5.8 VD7.2 | length 77.1
  Top Layer w0.279: C14.2@62.941,38.481 64.135,38.481 64.69,37.926 U4.28 ; C17.2 63.274,26.926 U4.50 ; U4.21 70.123,43.383 ; C15.2 70.123,44.165 70.123,43.383 ; U4.19 71.123,43.177 v1(70.917,43.383) 70.123,43.383 ; U4.11 75.123,41.621 76.175,42.672 v1(77.622,42.672) ; U4.6 v1(77.622,42.672) v1(77.622,42.672) ; v1@77.724,42.774 v1(77.622,42.672) ; v1(79.146,21.717) C16.2 80.123,21.754 U4.75 ; U4.100 84.365,38.926 C13.2@85.077,38.214
  Top Layer w0.508: R49.1 R50.2 v1(19.328,37.465) C19.2 ; SW1.4 41.496,34.501 40.894,35.103 v1(40.894,35.763) 42.895,35.763 SW1.3 ; P1.1 62.992,11.792 C96.1 ; v1(62.967,25.527) C17.2 ; C14.2@63.043,38.76 v1(63.043,39.548) ; C12.2 65.405,46.076 L1.1 65.43,47.269 v1(65.405,47.295) ; R10.1 v1(68.123,53.746) ; v1@77.724,42.774 C18.2 ; v1(79.604,52.603) 80.81,52.603 R9.1 R6.1 ; VD7.2 v1(80.62,5.159) 81.036,5.159 R40.1 ; v1(85.077,37.338) C13.2@85.077,38.214 ; R2.1 98.146,52.654 v1(98.171,52.68) ; R1.1 v1(97.015,48.616) 97.015,47.892 96.967,47.844 U5.8 ; L9.2 98.781,36.297 v1(98.781,34.493) C11.2
  Top Layer w1.524: P10.9 P10.10 P20.1 P20.2
VCC_5V: L8.1 P10.13 P10.14 P20.5 P20.6 | length 36
  Top Layer w0.508: L8.1 108.56,33.401 106.07,30.912 106.07,17.882 109.24,14.712 P20.6
  Top Layer w1.524: P10.13 P10.14 P20.5 P20.6
VCCA_3.3V: C2.2 C3.2 L1.2 U4.22 | length 7.5
  Top Layer w0.254: C2.2@68.631,44.323 C2.2
  Top Layer w0.279: C2.2 68.656,44.12 69.623,43.153 U4.22
  Top Layer w0.508: L1.2 C2.2@68.631,44.323
pads on no net: P30.5 P30.8 P30.10 P30.12 U4.4 U4.7 U4.8 U4.9 U4.25 U4.26 U4.33 U4.34 U4.35 U4.36 U4.38 U4.39 U4.43 U4.47 U4.48 U4.51 U4.58 U4.59 U4.60 U4.61 U4.62 U4.63 U4.64 U4.65 U4.66 U4.67 U4.82 U4.84 U4.85 U4.88 U4.95 U4.96 U4.97 U4.98

## Polygon pours and split planes (outlines as drawn)
GND on Signal Layer 1 "Top Layer-No Net" (solid, remove dead copper, pour order 10): 118.948,0.94 117.475,0.94 32.512,0.94 31.699,1.753 31.394,2.057 31.394,4.394 31.394,6.452 30.378,7.468 16.51,7.468 15.646,7.468 14.859,6.68 14.732,6.553 14.732,2.337 14.732,1.905 13.868,1.041 13.818,0.991 3.099,0.991 2.007,2.083 2.007,50.927 6.045,54.966 115.468,54.966 119.202,51.232 119.202,35.307 119.202,35.052 119.583,34.671 123.393,34.671 125.679,32.385 125.679,7.671
VCC_3.3V on Signal Layer 2 "Top Layer-No Net" (solid, remove dead copper, pour order 9): 118.948,0.94 117.475,0.94 32.512,0.94 31.699,1.753 31.394,2.057 31.394,4.394 31.394,6.452 30.378,7.468 16.51,7.468 15.646,7.468 14.859,6.68 14.732,6.553 14.732,2.337 14.732,1.905 13.868,1.041 13.818,0.991 3.099,0.991 2.007,2.083 2.007,50.927 6.045,54.966 115.468,54.966 119.202,51.232 119.202,35.307 119.202,35.052 119.583,34.671 123.393,34.671 125.679,32.385 125.679,7.671
GND on Top Layer "Top Layer-No Net" (solid, remove dead copper, pour order 13): 79.623,41.904 79.618,41.91 70.637,41.91 70.637,53.01 70.739,53.111 70.992,52.858 79.983,52.858 79.983,42.264 79.623,41.904

## Keep-outs
Keep-Out Layer:
  circle w0.1: c59.995,71.933 r8
  circle w0.1: c96.495,86.995 r3
  circle w0.1: c96.495,62.001 r3
  circle w0.1: c23.495,62.001 r3
  circle w0.1: c23.495,86.995 r3

## Other copper
Top Layer:
  region net VCC_3.3V: 70.714,43.282 71.018,43.586 70.445,44.16 70.14,43.855
  rectangle net VCC_3.3V: 70.123,43.383 70.561,44.165
  region net NetD7_1: 116.234,10.087 117.67,8.65 124.424,15.403 122.987,16.84
  rectangle net NetC20_2: 114.63,21.438 124.689,25.222
  rectangle net NetC20_2: 114.224,21.514 119.202,34.671
  rectangle net NetC20_2: 112.7,37.821 117.323,39.751
  rectangle net NetC20_2: 114.198,34.087 117.323,39.192
Bottom Layer:
  rectangle net NetD7_1: 116.027,1.23 118.13,12.268
  rectangle net GND: 110.896,1.194 115.164,14.554
  rectangle net VCC_5V: 108.306,1.321 110.109,12.243
  rectangle net GND: 105.791,1.346 107.645,14.554
  rectangle net VCC_3.3V: 103.099,1.473 105.131,12.192
  rectangle net GND: 105.74,12.802 115.214,15.138

## Silkscreen, mask and mechanical layers (free items; w line width, h text height)
Top Overlay:
  lines w0.1: 17.958,24.206 17.755,24.409 17.755,31.293 19.304,32.842 19.304,39.802 ; 52.63,42.953 70.738,42.953 ; 70.002,1.092 85.954,1.092 ; 80.62,44.831 89.118,44.831 ; 99.67,27.559 99.67,38.786 ; 103.632,38.735 103.632,35.255 104.521,34.366 104.521,31.674 104.496,31.648 ; -4.656,71.59 2.344,71.59 2.344,87.59 -4.656,87.59 -4.656,71.59 ; -3.676,77.09 -1.236,77.09 -1.236,53.94 -1.075,53.94 -1.075,77.09 1.325,77.09 1.325,82.09 -1.075,82.09 -1.075,105.24 -1.236,105.24 -1.236,82.09 -3.676,82.09 -3.676,77.09 ; 117.654,71.59 117.654,87.59 124.654,87.59 124.654,71.59 117.654,71.59 ; 118.675,77.09 118.675,82.09 121.075,82.09 121.075,105.24 121.237,105.24 121.237,82.09 123.677,82.09 123.677,77.09 121.237,77.09 121.237,53.94 121.075,53.94 121.075,77.09 118.675,77.09
  text "DROP CONTROL BDNO3 V1.0" at 36.043,128.727 h1.8
Mechanical 1:
  circle w0.1: c121.154,75.597 r1.35
  circle w0.1: c121.154,83.598 r1.35
  circle w0.1: c-1.156,75.597 r1.35
  circle w0.1: c-1.156,83.598 r1.35
  circle w0.1: c60,71.95 r6.5
  circle w0.1: c23.5,87.012 r1.65
  circle w0.1: c23.5,61.993 r1.65
  circle w0.1: c96.5,87.012 r1.65
  circle w0.1: c96.5,62 r1.65
  lines w0.1: 120,0 120,0 ; 120,0 29.773,0 29.773,7 15.773,7 15.773,0 0,0 -8,8 -8,11.933 -1,11.933 -1,25.933 -8,25.933 -8,36.4 -1,36.4 -1,50.4 -8,50.4 -8,110.2 -1,110.2 -1,124.2 -8,124.2 -8,125.5 0,133.5 120,133.5 128,125.5 128,124.2 121,124.2 121,110.2 128,110.2 128,50.4 121,50.4 121,36.4 128,36.4 128,8 120,0

## Text inside footprints (layer, text, board x,y; h text height)
P10: Top Overlay "2" at 91.46,4.532 h1.6; Top Overlay "1" at 91.46,1.992 h1.6; Top Overlay "16" at 113.812,4.786 h1.02; Top Overlay "15" at 113.812,1.738 h1.02; Top Overlay "19" at 118.511,1.992 h1.6; Top Overlay "20" at 118.638,4.532 h1.6
P11: Top Overlay "2" at 87.54,8.968 h1.6 r180; Top Overlay "1" at 87.54,11.508 h1.6 r180; Top Overlay "11" at 70.649,11.508 h1.6 r180; Top Overlay "12" at 70.649,8.968 h1.6 r180
P20: Top Overlay "12" at 118.511,10.532 h1.6; Top Overlay "11" at 118.511,7.992 h1.6; Top Overlay "1" at 101.62,7.992 h1.6; Top Overlay "2" at 101.62,10.532 h1.6
P30: Top Overlay "12" at 6.968,48.351 h1.6 r90; Top Overlay "11" at 9.508,48.351 h1.6 r90; Top Overlay "1" at 9.508,31.46 h1.6 r90; Top Overlay "2" at 6.968,31.46 h1.6 r90
SW1: Top Overlay "ON" at 45.357,33.739 h1 r90